# Altium PCB main.PcbDoc (part 3 of 3)
Units mm, origin at the board's own origin, x right, y up, seen from the top; angles counter-clockwise.
Board outline 200 x 85 mm, 2 copper layers (Top Layer, Bottom Layer); 362 components, 202 nets, 1059 pads, 878 vias.
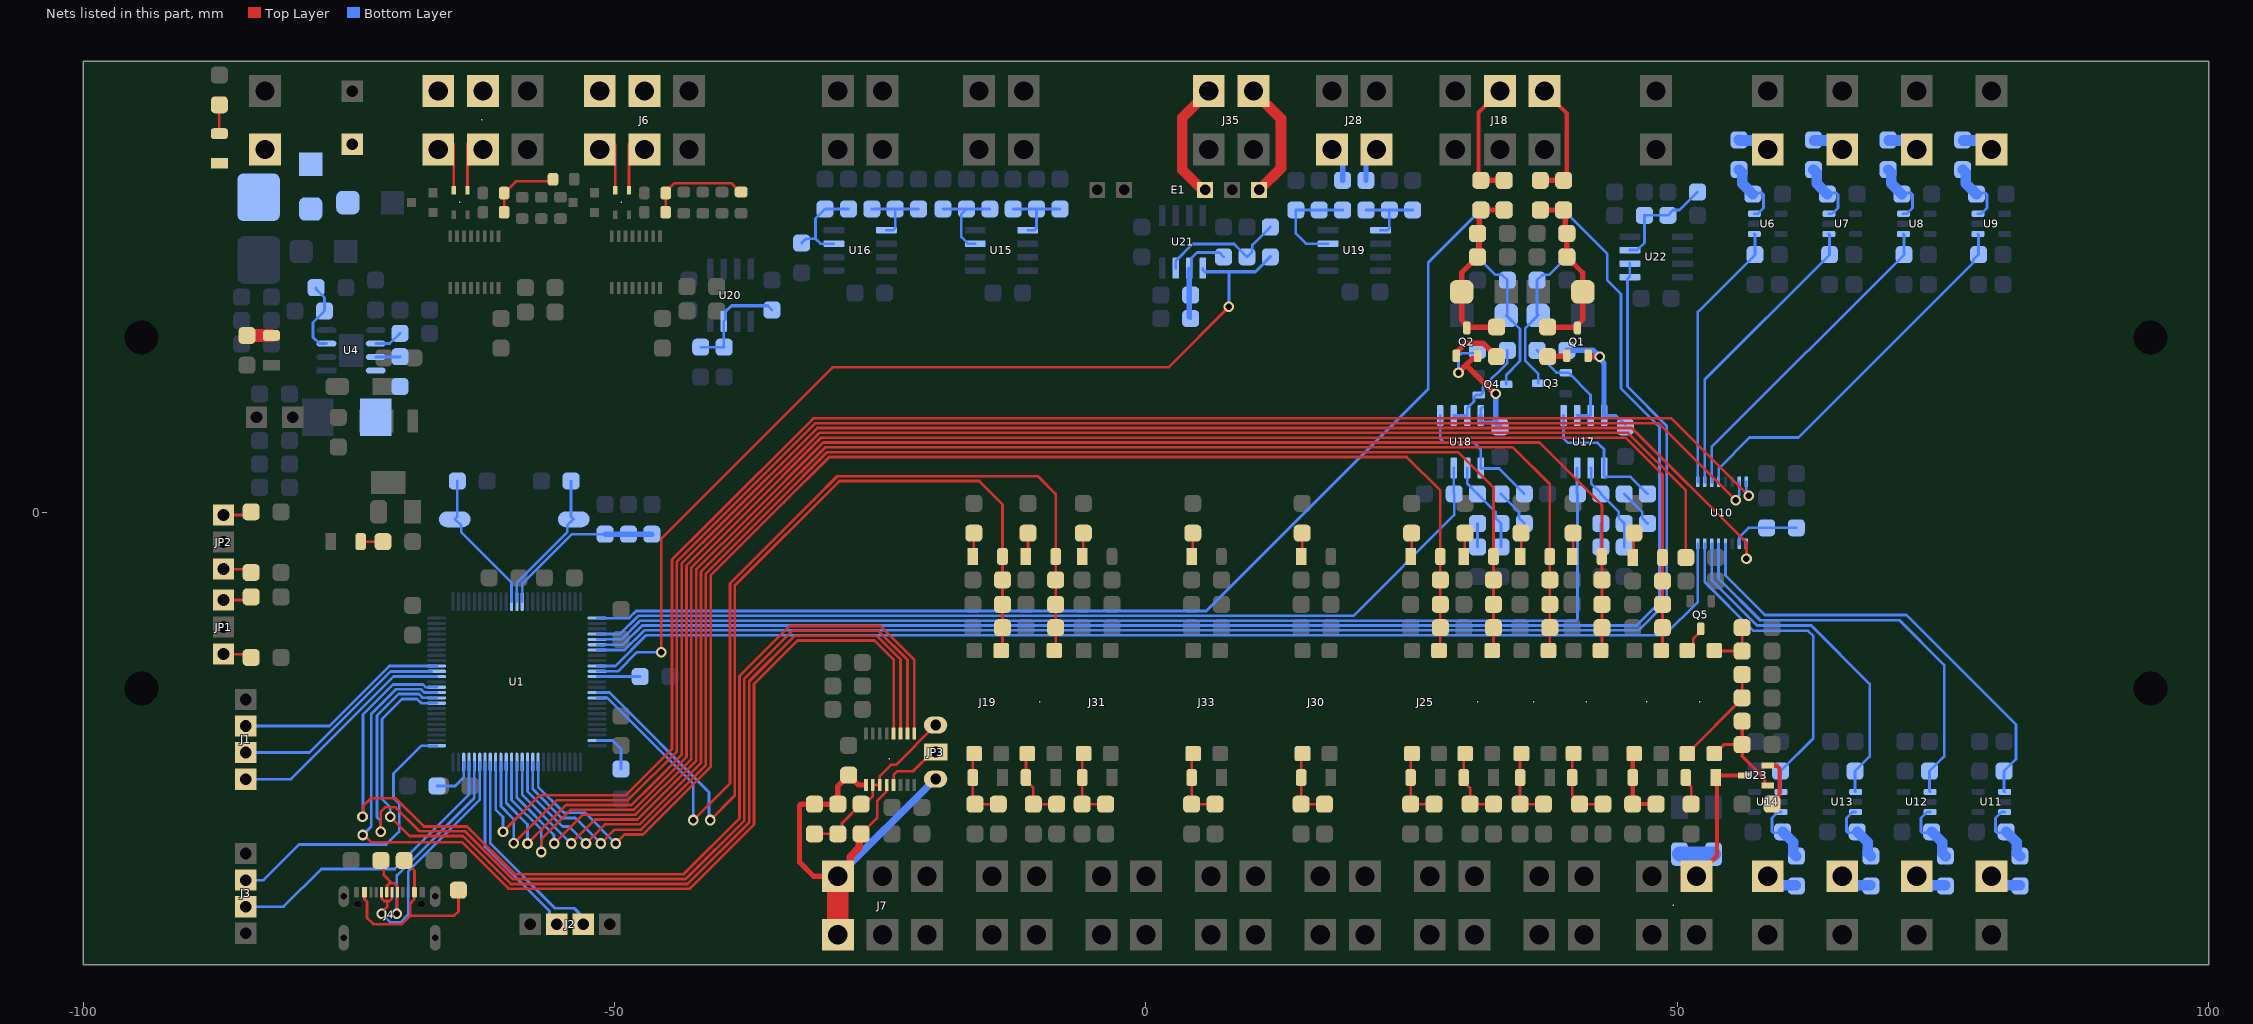
[diagram p3: the nets of this part, all layers, seen from the top]

## Via types
v1: diameter 1, hole 0.6, Top Layer to Bottom Layer, tented both sides, 876 vias
v2: diameter 1, hole 0.6, Top Layer to Bottom Layer, 2 vias

## Nets (pads, with @x,y where several pads share a name; then routed paths per layer and width w, separated by ;. In a path a pad name is that pad's centre, name@x,y a point inside that pad or via, vN(x,y) a via of type N, cw(c..) or ccw(c..) an arc to the next point about the centre after c; other vN are vias at no path point) (continued)
NetC1_2: C1.2 FUSE_SMD1.2 J4.A4B9 J4.B4A9 | length 19.2
  Top Layer w0.254: J4.A4B9@-73.54,-36.081 -73.54,-36.341 -73.3,-36.581 -73.3,-38.1 -72.7,-38.7 -70.026,-38.7 -69.225,-37.899 ; C1.2@-69.8,-32.7 -68.84,-33.66 J4.B4A9@-68.84,-35.68 -68.863,-35.703 -68.863,-36.364 -69.225,-36.726 -69.225,-37.899 ; FUSE_SMD1.2@-64.7,-35.5 -64.7,-37.5 -65.099,-37.899 -69.225,-37.899
NetC2_2: C2.2 U1.13 X1.1 | length 13.7
  Bottom Layer w0.254: U1.13@-59.2,-8.35 -59.2,-6.558 -54.473,-1.831 -54.473,-1.176 -53.897,-0.6 X1.1@-53.85,-0.6 -54.1,-0.35 C2.2@-54.1,3
NetC3_2: C3.2 U1.12 X1.2 | length 13.6
  Bottom Layer w0.254: X1.2@-65.05,-0.6 -64.8,-0.35 C3.2@-64.8,3 ; X1.2@-65.003,-0.6 -64.427,-1.176 -64.427,-1.831 -59.7,-6.558 U1.12@-59.7,-8.35
NetC6_2: C6.2 U1.73 | length 4.3
  Bottom Layer w0.254: C6.2@-66.7,-25.7 -65,-25.7 -64.209,-24.909 -64.209,-23.459 U1.73@-64.2,-23.45
NetC7_2: C7.2 U1.49 | length 4.5
  Bottom Layer w0.254: U1.49@-51.65,-21.4 -51.641,-21.409 -50.191,-21.409 -49.4,-22.2 C7.2@-49.4,-24.1
NetC14_1: ..1@-55.8,31.4 ..1@-60.4,30.1 ..2@-60.4,28.3 | length 7
  Top Layer w0.254: ..2@-60.4,28.3 ..1@-60.4,30.1 -60.4,30.133 -60.036,30.497 -60.003,30.497 -59.3,31.2 -56,31.2 ..1@-55.8,31.4
NetC21_1: ..1@-45.2,30.1 ..2@-45.2,28.3 C21.1 | length 9.7
  Top Layer w0.254: ..2@-45.2,28.3 ..1@-45.2,30.1 -45.2,30.2 -44.373,31.027 -39.027,31.027 -38.2,30.2 C21.1@-38.1,30.2
NetC29_1: C29.1 U4.6 | length 2.7
  Bottom Layer w0.254: U4.6@-72.484,15.935 -71.165,15.935 C29.1@-70.2,16.9
NetC30_1: C30.1 U4.7 | length 2.3
  Bottom Layer w0.254: U4.7@-72.484,14.665 -70.235,14.665 C30.1@-70.2,14.7
NetC30_2: C30.2 L3.1 U4.8
NetC67_1: ..1@-16.9,28.6 ..2@-14.7,28.6 R32.1 U15.3 | length 8.8
  Bottom Layer w0.254: R32.1@-19.1,28.6 ..1@-16.9,28.6 ; U15.3@-16.07,25.335 -16.755,25.335 -17.382,25.962 -17.382,28.118 ..1@-16.9,28.6 ; ..2@-14.7,28.6 ..1@-16.9,28.6
NetC68_1: ..1@-10.3,28.6 ..2@-12.5,28.6 R33.1 U15.5 | length 7.1
  Bottom Layer w0.254: ..2@-12.5,28.6 ..1@-10.3,28.6 ; U15.5@-11.13,26.605 -10.473,26.605 -10.3,26.778 ..1@-10.3,28.6 ; R33.1@-8.1,28.6 ..1@-10.3,28.6
NetC70_1: ..2@-28,28.6 C70.1 R36.1 U16.3 | length 8.8
  Bottom Layer w0.254: C70.1@-32.4,25.4 -32,25.8 -31.1,25.8 ; U16.3@-29.37,25.335 -30.635,25.335 -31.1,25.8 ; ..2@-28,28.6 R36.1@-30.2,28.6 -31.1,27.7 -31.1,25.8
NetC71_1: ..1@-23.6,28.6 ..2@-25.8,28.6 R37.1 U16.5 | length 7.1
  Bottom Layer w0.254: ..2@-25.8,28.6 ..1@-23.6,28.6 ; U16.5@-24.43,26.605 -23.773,26.605 -23.6,26.778 ..1@-23.6,28.6 ; R37.1@-21.4,28.6 ..1@-23.6,28.6
NetC72_1: ..1@37.1,28.5 C72.1 C73.1 D8.2 Q1.3 R42.1 R44.2 | length 17.1
  Top Layer w0.254: R44.2@37.8,17.5 R44.2@37.837,17.462 ; R42.1@39.3,28.5 R42.1@39.45,28.35 ; C73.1@39.45,26.45 C73.1@39.6,26.3 ; Q1.3@40.537,17.462 Q1.3@40.6,17.4 Q1.3@40.6,17.676
  Top Layer w0.5: ..1@37.1,28.5 R42.1@39.3,28.5 ; R44.2@37.837,17.462 Q1.3@40.537,17.462 ; C73.1@39.45,26.45 R42.1@39.45,28.35 ; C73.1@39.6,26.3 C72.1@39.6,24.1 41.1,22.6 D8.2@41.1,20.8 41.1,18.176 Q1.3@40.6,17.676
NetC74_1: ..1@33.7,28.5 C74.1 C75.1 D9.2 Q2.3 R45.2 R47.1 | length 17.1
  Top Layer w0.254: Q2.3@30.2,17.676 Q2.3@30.2,17.4 Q2.3@30.262,17.462 ; C74.1@31.2,24.1 C74.1@31.35,24.25 ; R47.1@31.35,28.35 R47.1@31.5,28.5 ; R45.2@32.962,17.462 R45.2@33,17.5
  Top Layer w0.5: Q2.3@30.2,17.676 29.7,18.176 D9.2@29.7,20.8 29.7,22.6 C74.1@31.2,24.1 ; Q2.3@30.262,17.462 R45.2@32.962,17.462 ; C74.1@31.35,24.25 R47.1@31.35,28.35 ; R47.1@31.5,28.5 ..1@33.7,28.5
NetC76_1: C76.1 D10.2 Q3.3 R48.1 R50.1 | length 16.7
  Bottom Layer w0.254: Q3.3@36.9,12.2 36.9,13.1 35.673,14.327 35.673,17.373 D10.2@36.9,18.6 36.8,18.7 C76.1@36.8,21.9 37.304,22.404 37.904,22.404 R48.1@39.6,24.1 R50.1@39.6,26.3
NetC77_1: C77.1 D11.2 Q4.3 R49.1 R51.1 | length 16.8
  Bottom Layer w0.254: R51.1@31.2,26.3 R49.1@31.2,24.1 32.896,22.404 33.496,22.404 C77.1@34,21.9 34,18.7 D11.2@33.9,18.6 35.2,17.3 35.2,14.3 33.9,13 Q4.3@33.9,12.1
NetC78_1: C78.1 U1.30 U17.3 | length 107.2
  Bottom Layer w0.254: U1.30@-51.65,-11.9 -49.353,-11.9 -47.591,-10.138 40.451,-10.138 40.6,-9.989 C78.1@40.6,1.778 ; C78.1@40.565,1.8 U17.3@40.565,4.23
NetC79_1: C79.1 U1.29 U18.3 | length 89.7
  Bottom Layer w0.254: U1.29@-51.65,-11.4 -49.495,-11.4 -47.779,-9.684 19.516,-9.684 29,-0.2 C79.1@29,1.8 28.96,1.84 U18.3@28.96,4.23
NetC82_1: C82.1 R54.1 R59.1 U17.2 | length 8.7
  Bottom Layer w0.254: U17.2@41.835,4.23 41.884,4.181 41.884,2.788 42.8,1.872 R59.1@42.8,1.8 44.496,0.104 44.496,-0.496 R54.1@45,-1 C82.1@45,-3.2
NetC83_1: C83.1 R56.1 R58.1 U18.2 | length 8.7
  Bottom Layer w0.254: U18.2@30.23,4.23 30.23,2.77 R58.1@31.2,1.8 32.896,0.104 32.896,-0.496 R56.1@33.4,-1 C83.1@33.4,-3.2
NetC91_1: ..1@16.3,28.5 ..2@18.5,28.5 R94.1 U19.3 | length 10
  Bottom Layer w0.254: U19.3@17.13,25.335 15.065,25.335 14.1,26.3 R94.1@14.1,28.5 ..1@16.3,28.5 ..2@18.5,28.5
NetC92_1: ..1@22.9,28.5 ..2@20.7,28.5 C92.1 U19.5 | length 7
  Bottom Layer w0.254: ..2@20.7,28.5 ..1@22.9,28.5 ; U19.5@22.07,26.605 22.727,26.605 22.9,26.778 ..1@22.9,28.5 ; C92.1@25.1,28.5 ..1@22.9,28.5
NetC94_1: C94.1 R96.2 R97.1 U20.3 | length 10.4
  Bottom Layer w0.254: C94.1@-41.9,15.6 R97.1@-39.7,15.6 -39.747,15.646 U20.3@-39.747,18.03 -39.574,18.203 U20.3@-39.574,18.926 ; R96.2@-35.6,19.5 R96.2@-35.2,19.1
  Bottom Layer w0.3: U20.3@-39.574,18.926 -39,19.5 R96.2@-35.6,19.5
NetC99_2: C99.2 R114.1 R116.2 U21.2 | length 9.2
  Bottom Layer w0.251: U21.2@4.07,22.96 4.244,23.134 4.244,23.944 4.8,24.5 6.9,24.5 R114.1@7.3,24.1
  Bottom Layer w0.254: C99.2@4.07,18.43 C99.2@4.2,18.3
  Bottom Layer w0.5: C99.2@4.07,18.43 4.07,20.5 U21.2@4.07,22.96
NetC101_1: C101.1 R117.1 R118.2 U22.3 | length 10.1
  Bottom Layer w0.254: U22.3@45.53,24.735 46.215,24.735 46.9,25.42 R117.1@46.9,28 R118.2@49.1,28 49.604,28.504 50.204,28.504 C101.1@51.9,30.2
NetC102_1: ..1@48.6,-10.8 ..2@48.6,-6.4 ..2@48.6,-8.6 ..3@48.47,-12.95 D34.2 U1.63 | length 157.8
  Top Layer w0.254: v1(-55.7,-31.1) -52.992,-28.392 -48.036,-28.392 -42.784,-23.14 -42.784,-5.152 -37.92,-0.288 -37.92,-0.277 -30.556,7.086 45.114,7.086 48.6,3.6 D34.2@48.6,-4.2 ..2@48.6,-6.4 ..2@48.6,-8.6 ..1@48.6,-10.8 48.6,-12.82 ..3@48.47,-12.95
  Bottom Layer w0.254: U1.63@-59.2,-23.45 -59.2,-26.8 -55.7,-30.3 v1(-55.7,-31.1)
NetD1_2: D1.2 D4.2 FH1.1
NetD2_2: D2.2 R12.2 | length 2.7
  Top Layer w0.254: D2.2@-87.2,35.7 R12.2@-87.2,38.4
NetD3_2: D3.2 R13.2 | length 2.3
  Top Layer w1.2: R13.2@-84.6,16.7 D3.2@-82.3,16.7
NetD6_2: D6.2 R14.2 | length 2.1
  Top Layer w0.254: D6.2@-73.9,-2.7 R14.2@-71.8,-2.7
NetD12_2: ..1@-13.9,-27.4 ..2@-16.3,-24.9 J19.1 R63.1 | length 7.1
  Top Layer w0.254: J19.1@-16.17,-22.65 -16.3,-22.78 ..2@-16.3,-24.9 -16.3,-27.2 R63.1@-16.1,-27.4 ..1@-13.9,-27.4
NetD13_1: D13.1 R66.2 | length 2.2
  Top Layer w0.254: D13.1@-16.3,-4.1 -16.2,-4 R66.2@-16.2,-1.9
NetD14_2: ..1@-8.4,-27.4 ..1@-10.6,-27.4 ..1@-11.17,-22.65 ..2@-11.3,-24.9 | length 7.3
  Top Layer w0.254: ..1@-11.17,-22.65 -11.3,-22.78 ..2@-11.3,-24.9 -11.3,-25.2 -10.6,-25.9 ..1@-10.6,-27.4 ..1@-8.4,-27.4
NetD15_1: D15.1 R71.2 | length 2.3
  Top Layer w0.254: D15.1@-11.3,-4.1 -11.1,-3.9 R71.2@-11.1,-1.9
NetD16_2: ..1@35.2,-27.4 ..1@35.33,-22.65 ..1@37.4,-27.4 ..2@35.2,-24.9 | length 7
  Top Layer w0.254: ..1@35.33,-22.65 35.2,-22.78 ..2@35.2,-24.9 ..1@35.2,-27.4 ..1@37.4,-27.4
NetD17_2: ..1@27.1,-27.4 D17.2 J25.1 R74.1 | length 7
  Top Layer w0.254: J25.1@25.03,-22.65 24.9,-22.78 D17.2@24.9,-24.9 R74.1@24.9,-27.4 ..1@27.1,-27.4
NetD18_1: D18.1 R80.2 | length 2.2
  Top Layer w0.254: D18.1@35.2,-4.1 35.3,-4 R80.2@35.3,-1.9
NetD19_1: D19.1 R81.2 | length 2.2
  Top Layer w0.254: D19.1@24.9,-4.1 25,-4 R81.2@25,-1.9
NetD20_2: ..1@40.8,-27.4 ..1@40.23,-22.65 ..1@43,-27.4 ..2@40.1,-24.9 | length 7.3
  Top Layer w0.254: ..1@40.23,-22.65 40.1,-22.78 ..2@40.1,-24.9 40.1,-26.552 40.8,-27.252 ..1@40.8,-27.4 ..1@43,-27.4
NetD21_2: ..1@30.03,-22.65 ..1@30.5,-27.4 ..1@32.7,-27.4 ..2@29.9,-24.9 | length 7.3
  Top Layer w0.254: ..1@30.03,-22.65 29.9,-22.78 ..2@29.9,-24.9 29.9,-25.267 30.5,-25.867 ..1@30.5,-27.4 ..1@32.7,-27.4
NetD22_1: ..1@40.1,-4.1 R90.2 | length 2.2
  Top Layer w0.254: ..1@40.1,-4.1 40.2,-4 R90.2@40.2,-1.9
NetD23_1: D23.1 R91.2 | length 2.2
  Top Layer w0.254: D23.1@29.9,-4.1 30,-4 R91.2@30,-1.9
NetD24_2: ..1@16.8,-27.4 D24.2 J30.1 R99.1 | length 7
  Top Layer w0.254: J30.1@14.73,-22.65 14.6,-22.78 D24.2@14.6,-24.9 R99.1@14.6,-27.4 ..1@16.8,-27.4
NetD25_1: D25.1 R102.2 | length 2.2
  Top Layer w0.254: D25.1@14.6,-4.1 14.7,-4 R102.2@14.7,-1.9
NetD26_2: ..1@-3.8,-27.4 ..1@-6,-27.4 D26.2 J31.1 | length 7
  Top Layer w0.254: J31.1@-5.87,-22.65 -6,-22.78 D26.2@-6,-24.9 ..1@-6,-27.4 ..1@-3.8,-27.4
NetD27_1: D27.1 R107.2 | length 2.2
  Top Layer w0.254: D27.1@-6,-4.1 -5.9,-4 R107.2@-5.9,-1.9
NetD28_2: ..1@6.5,-27.4 D28.2 J33.1 R109.1 | length 7
  Top Layer w0.254: J33.1@4.43,-22.65 4.3,-22.78 D28.2@4.3,-24.9 R109.1@4.3,-27.4 ..1@6.5,-27.4
NetD29_1: D29.1 R112.2 | length 2.2
  Top Layer w0.254: D29.1@4.3,-4.1 4.4,-4 R112.2@4.4,-1.9
NetD30_1: ..3@51.8,-34.191 D30.1 D31.2 D32.2 U23.3 | length 19.7
  Top Layer w0.254: D30.1@53.727,-25.027 D30.1@53.6,-24.9 D30.1@53.8,-24.7
  Top Layer w0.4: ..3@51.8,-34.191 53.727,-32.264 D30.1@53.727,-25.027 ; D30.1@53.8,-24.7 U23.3@56.308,-24.7
  Bottom Layer w0.254: ..3@51.8,-35 53.13,-33.67 53.13,-32.37 D31.2@53.4,-32.1
  Bottom Layer w1.4: D32.2@50.2,-32.1 D31.2@53.4,-32.1
NetD30_2: D30.2 R129.1 | length 2.7
  Top Layer w0.254: D30.2@50.8,-24.9 50.8,-25.267 51.3,-25.767 R129.1@51.3,-27.4
NetD33_2: ..1@45.8,-27.4 ..1@45.93,-22.65 ..1@48,-27.4 ..2@45.8,-24.9 | length 7
  Top Layer w0.254: ..1@45.8,-22.78 ..1@45.93,-22.65
  Top Layer w0.4: ..1@45.8,-22.78 ..2@45.8,-24.9 ..1@45.8,-27.4 ..1@48,-27.4
NetD34_1: D34.1 R134.2 | length 2.3
  Top Layer w0.254: D34.1@45.8,-4.2 45.9,-4.1 R134.2@45.9,-1.9
NetE1_2: E1.2 J35.1 | length 11.4
  Top Layer w1: E1.2@5.57,30.4 5.32,30.65 5.05,30.65 3.4,32.3 3.4,37.191 J35.1@5.9,39.691
NetE1_4: E1.4 J35.2 | length 11.2
  Top Layer w1: J35.2@10.1,39.691 12.7,37.091 12.7,32.45 E1.4@10.65,30.4
NetF1_1: F1.1 R20.1 U6.3 | length 6.2
  Bottom Layer w0.254: R20.1@57.1,30.1 57.951,30.1 58.1,29.951 58.1,28.7 57.55,28.15 U6.3@57.245,28.15
  Bottom Layer w1: F1.1@55.8,32.3 56.1,32 56.1,31 R20.1@57.1,30
NetF1_2: F1.2 J8.2 | length 2.7
  Bottom Layer w1: F1.2@55.8,35.1 55.85,35.05 58.45,35.05 J8.2@58.5,35
NetF2_1: F2.1 R21.1 U7.3 | length 6.2
  Bottom Layer w0.254: R21.1@64.114,30.1 64.965,30.1 65.114,29.951 65.114,28.7 64.564,28.15 U7.3@64.259,28.15
  Bottom Layer w1: F2.1@62.814,32.3 63.114,32 63.114,31 R21.1@64.114,30
NetF2_2: F2.2 J9.2 | length 2.6
  Bottom Layer w1: F2.2@62.864,35.05 J9.2@65.464,35.05
NetF3_1: F3.1 R22.1 U8.3 | length 6.2
  Bottom Layer w0.254: R22.1@71.129,30.1 71.98,30.1 72.129,29.951 72.129,28.7 71.579,28.15 U8.3@71.274,28.15
  Bottom Layer w1: F3.1@69.829,32.3 70.129,32 70.129,31 R22.1@71.129,30
NetF3_2: F3.2 J10.2 | length 2.6
  Bottom Layer w1: F3.2@69.879,35.05 J10.2@72.479,35.05
NetF4_1: F4.1 R23.1 U9.3 | length 6.2
  Bottom Layer w0.254: R23.1@78.143,30.1 78.994,30.1 79.143,29.951 79.143,28.7 78.593,28.15 U9.3@78.288,28.15
  Bottom Layer w1: F4.1@76.843,32.3 77.143,32 77.143,31 R23.1@78.143,30
NetF4_2: F4.2 J11.2 | length 2.6
  Bottom Layer w1: F4.2@76.893,35.05 J11.2@79.493,35.05
NetF5_1: F5.1 R25.1 U11.3 | length 6.2
  Bottom Layer w0.254: U11.3@80.798,-28.15 80.493,-28.15 79.943,-28.7 79.943,-29.951 80.092,-30.1 R25.1@80.943,-30.1
  Bottom Layer w1: R25.1@80.943,-30 81.943,-31 81.943,-32 F5.1@82.243,-32.3
NetF5_2: F5.2 J12.2 | length 2.6
  Bottom Layer w1: J12.2@79.593,-35.05 F5.2@82.193,-35.05
NetF6_1: F6.1 R26.1 U12.3 | length 6.2
  Bottom Layer w0.254: U12.3@73.784,-28.15 73.479,-28.15 72.929,-28.7 72.929,-29.951 73.077,-30.1 R26.1@73.929,-30.1
  Bottom Layer w1: R26.1@73.929,-30 74.929,-31 74.929,-32 F6.1@75.229,-32.3
NetF6_2: F6.2 J13.2 | length 2.6
  Bottom Layer w1: J13.2@72.579,-35.05 F6.2@75.179,-35.05
NetF7_1: F7.1 R28.1 U13.3 | length 6.2
  Bottom Layer w0.254: U13.3@66.769,-28.15 66.464,-28.15 65.914,-28.7 65.914,-29.951 66.063,-30.1 R28.1@66.914,-30.1
  Bottom Layer w1: R28.1@66.914,-30 67.914,-31 67.914,-32 F7.1@68.214,-32.3
NetF7_2: F7.2 J14.2 | length 2.6
  Bottom Layer w1: J14.2@65.564,-35.05 F7.2@68.164,-35.05
NetF8_1: F8.1 R29.1 U14.3 | length 6.2
  Bottom Layer w0.254: U14.3@59.755,-28.15 59.45,-28.15 58.9,-28.7 58.9,-29.951 59.049,-30.1 R29.1@59.9,-30.1
  Bottom Layer w1: R29.1@59.9,-30 60.9,-31 60.9,-32 F8.1@61.2,-32.3
NetF8_2: F8.2 J15.2 | length 2.6
  Bottom Layer w1: J15.2@58.55,-35.05 F8.2@61.15,-35.05
NetJ1_1: J1.1 U1.89 | length 21.9
  Bottom Layer w0.254: J1.1@-84.7,-25.05 -80.45,-25.05 -70.8,-15.4 U1.89@-66.75,-15.4
NetJ1_2: J1.2 U1.90 | length 20.7
  Bottom Layer w0.254: J1.2@-84.7,-22.55 -78.708,-22.55 -71.081,-14.923 U1.90@-67.2,-14.923
NetJ1_3: J1.3 U1.91 | length 20.3
  Bottom Layer w0.254: J1.3@-84.7,-20.05 -76.85,-20.05 -71.2,-14.4 U1.91@-66.75,-14.4
NetJ2_2: J2.2 U1.68 | length 19.9
  Bottom Layer w0.254: U1.68@-61.7,-23.45 -61.7,-31.1 -55.6,-37.2 -53.8,-37.2 -52.95,-38.05 J2.2@-52.95,-38.7
NetJ2_3: J2.3 U1.69 | length 18
  Bottom Layer w0.254: U1.69@-62.2,-23.45 -62.2,-31.4 -56.132,-37.468 -56.132,-38.018 J2.3@-55.45,-38.7
NetJ4_A6: J4.A6 J4.B6 R5.2 U1.71 | length 24.3
  Top Layer w0.254: R5.2@-72,-32.7 -71.727,-32.973 -71.727,-34.082 -70.956,-34.853 -70.94,-34.853 ; J4.A6@-71.44,-35.68 -71.417,-35.657 -71.417,-35.088 -71.182,-34.853 -70.94,-34.853 ; v1(-70.5,-37.7) -70.463,-37.663 -70.463,-35.703 J4.B6@-70.44,-35.68 -70.463,-35.657 -70.463,-35.088 -70.698,-34.853 -70.94,-34.853
  Bottom Layer w0.254: v1(-70.5,-37.7) -70.5,-34.1 -63.2,-26.8 U1.71@-63.2,-23.45
NetJ4_A7: J4.A7 J4.B7 U1.70 | length 24
  Top Layer w0.254: J4.B7@-71.94,-35.68 -71.917,-35.703 -71.917,-36.272 -71.682,-36.507 -71.44,-36.507 ; v1(-71.9,-37.7) -71.9,-37.6 -71.4,-37.1 -71.4,-36.547 -71.44,-36.507 ; J4.A7@-70.94,-35.68 -70.963,-35.703 -70.963,-36.272 -71.198,-36.507 -71.44,-36.507
  Bottom Layer w0.254: v1(-71.9,-37.7) -71.073,-38.527 -70.157,-38.527 -69.429,-37.798 -69.429,-33.729 -62.7,-27 U1.70@-62.7,-23.45
NetJ5_1: ..1@-66.6,39.691 ..4@-65.15,30.35 ..4@-66.6,34.191 | length 5.8
  Top Layer w0.254: ..4@-66.6,34.691 -65.15,34.691 ..4@-65.15,30.35
NetJ5_2: ..2@-62.4,39.691 ..3@-63.85,30.35 ..5@-62.4,34.191 | length 5.8
  Top Layer w0.254: ..3@-63.85,30.35 -63.85,34.691 ..5@-62.4,34.691
NetJ6_1: ..4@-49.95,30.35 J6.1 J6.4 | length 5.8
  Top Layer w0.254: J6.4@-51.4,34.691 -49.95,34.691 ..4@-49.95,30.35
NetJ6_2: ..3@-48.65,30.35 J6.2 J6.5 | length 5.8
  Top Layer w0.254: ..3@-48.65,30.35 -48.65,34.691 J6.5@-47.2,34.691
NetJ18_2: ..2@33.7,31.3 J18.2 R47.2 | length 11.5
  Top Layer w0.4: R47.2@31.5,31.3 31.299,31.501 31.299,37.69 J18.2@33.3,39.691
  Top Layer w0.5: R47.2@31.5,31.3 ..2@33.7,31.3
NetJ18_3: ..2@37.1,31.3 J18.3 R42.2 | length 11.6
  Top Layer w0.254: R42.2@39.3,31.3 R42.2@39.6,31.6
  Top Layer w0.4: J18.3@37.5,39.691 39.6,37.591 R42.2@39.6,31.6
  Top Layer w0.5: ..2@37.1,31.3 R42.2@39.3,31.3
NetJ28_3: ..1@18.5,31.3 J28.3 | length 4.1
  Bottom Layer w0.254: J28.3@17.5,35 17.5,34.34 J28.3@18.5,33.34
  Bottom Layer w0.5: ..1@18.5,31.3 J28.3@18.5,33.34
NetJ28_4: ..1@20.7,31.3 J28.4 | length 4.1
  Bottom Layer w0.254: J28.4@20.7,33.34 21.7,34.34 J28.4@21.7,35
  Bottom Layer w0.5: ..1@20.7,31.3 J28.4@20.7,33.34
NetJ37_1: ..1@53.47,-12.95 R123.1 R124.1 | length 4.9
  Top Layer w0.254: ..1@53.47,-12.95 53.52,-13 R124.1@56.1,-13 R123.1@56.1,-10.8
NetJ37_2: ..2@50.93,-12.95 Q5.3 | length 2.6
  Top Layer w0.254: ..2@50.93,-12.95 51.486,-12.394 51.486,-11.864 52.2,-11.15 Q5.3@52.2,-10.9
NetJ37_3: ..3@50.93,-22.65 R125.1 R126.1 | length 9.6
  Top Layer w0.254: ..3@50.93,-22.65 50.933,-22.65 56.1,-17.483 R126.1@56.1,-17.4 R125.1@56.1,-15.2
NetJ37_4: ..4@53.47,-22.65 R121.2 R122.2 U23.1 | length 10.1
  Top Layer w0.254: ..4@53.47,-22.65 ..4@53.527,-22.65 ; U23.1@58.228,-25.487 58.381,-25.64 U23.1@58.492,-25.64
  Top Layer w0.3: ..4@53.527,-22.65 54.377,-21.8 R121.2@56.1,-21.8 ; R122.2@56.1,-19.6 R121.2@56.1,-21.8 ; U23.1@58.228,-25.487 58.228,-25.028 56.1,-22.9 R121.2@56.1,-21.8
NetJP1_1: JP1.1 R2.1 | length 2.7
  Top Layer w0.254: JP1.1@-86.8,-13.28 -86.777,-13.303 -84.497,-13.303 R2.1@-84.2,-13.6
NetJP1_3: JP1.3 R3.1 | length 2.7
  Top Layer w0.254: JP1.3@-86.8,-8.2 -86.787,-8.186 -84.487,-8.186 R3.1@-84.2,-7.9
NetJP2_1: JP2.1 R6.1 | length 2.7
  Top Layer w0.254: JP2.1@-86.8,-5.28 -86.777,-5.303 -84.497,-5.303 R6.1@-84.2,-5.6
NetJP2_3: JP2.3 R7.1 | length 2.7
  Top Layer w0.254: JP2.3@-86.8,-0.2 -86.787,-0.186 -84.487,-0.186 R7.1@-84.2,0.1
NetQ1_1: Q1.1 R44.1 | length 1.8
  Top Layer w0.254: R44.1@37.8,14.7 R44.1@37.837,14.738 ; Q1.1@39.537,14.738 Q1.1@39.6,14.8
  Top Layer w0.5: R44.1@37.837,14.738 Q1.1@39.537,14.738
NetQ2_1: Q2.1 R45.1 | length 5
  Top Layer w0.254: Q2.1@29.2,14.8 Q2.1@29.2,14.824
  Top Layer w0.5: Q2.1@29.2,14.824 29.3,14.924 29.3,15.2 30.08,15.98 31.72,15.98 R45.1@33,14.7
NetR1_1: R1.1 U1.37 | length 4.1
  Bottom Layer w0.254: U1.37@-51.65,-15.4 R1.1@-47.6,-15.4
NetR16_2: ..1@-78.1,21.2 R16.2 U4.3 | length 7
  Bottom Layer w0.254: ..1@-78.1,21.2 -78.1,21.052 -77.3,20.252 R16.2@-77.3,19 -78.38,17.92 -78.38,16.533 -77.782,15.935 U4.3@-77.116,15.935
NetR24_2: R24.2 R27.1 U10.2 | length 6.4
  Bottom Layer w0.254: U10.2@55.825,-2.918 55.843,-2.9 55.843,-2.257 56.7,-1.4 R24.2@61.2,-1.4
NetR38_2: ..2@33.7,28.5 R40.1 U1.26 | length 108.2
  Bottom Layer w0.254: U1.26@-51.65,-9.9 -48.637,-9.9 -47.967,-9.23 5.67,-9.23 26.561,11.661 26.561,23.561 R40.1@31.5,28.5 ..2@33.7,28.5
NetR39_2: ..2@37.1,28.5 R41.1 U1.31 | length 144.5
  Bottom Layer w0.254: U1.31@-51.65,-12.4 -49.211,-12.4 -47.403,-10.592 46.166,-10.592 48.327,-8.431 48.327,8.073 44.7,11.7 44.7,20.6 43.4,21.9 43.4,24.4 R41.1@39.3,28.5 ..2@37.1,28.5
NetR54_2: R54.2 R55.1 | length 3.7
  Bottom Layer w0.254: R54.2@45,1.8 46.696,0.104 46.696,-0.496 R55.1@47.2,-1
NetR56_2: R56.2 R57.1 | length 3.7
  Bottom Layer w0.254: R56.2@33.4,1.8 35.096,0.104 35.096,-0.496 R57.1@35.6,-1
NetR58_2: R58.2 R60.1 | length 2.2
  Bottom Layer w0.254: R60.1@31.2,-3.2 R58.2@31.2,-1
NetR59_2: R59.2 R61.1 | length 2.2
  Bottom Layer w0.254: R61.1@42.8,-3.2 R59.2@42.8,-1
NetR113_1: R113.1 R115.1 U21.3 | length 12.2
  Bottom Layer w0.254: U21.3@2.8,23.03 2.8,23.715 4.385,25.3 8.3,25.3 R115.1@9.5,24.1 10.004,24.604 10.004,25.204 R113.1@11.7,26.9
NetR113_2: R113.2 U1.36 U21.1 | length 90.4
  Top Layer w0.254: v1(-45.6,-13.1) -45.6,-2.4 -29.5,13.7 2.1,13.7 v1(7.8,19.4)
  Bottom Layer w0.254: U1.36@-51.65,-14.9 -49.7,-14.9 -47.9,-13.1 v1(-45.6,-13.1) ; U21.1@5.34,23.03 5.34,22.873 U21.1@5.513,22.7 ; 7.8,22.594 7.906,22.7
  Bottom Layer w0.3: U21.1@5.513,22.7 7.906,22.7 10.3,22.7 R113.2@11.7,24.1 ; v1(7.8,19.4) 7.8,22.594
NetR120_2: R120.2 U23.2 | length 5.2
  Top Layer w0.254: R120.2@58.482,-27.818 R120.2@58.9,-27.4 ; R120.2@59.132,-27.268 R120.2@59.132,-27.021
  Top Layer w0.4: U23.2@58.492,-23.76 58.531,-23.799 59.366,-23.799 59.6,-24.033 59.6,-26.552 R120.2@59.132,-27.021
NetR127_1: R127.1 U1.64 | length 153.4
  Top Layer w0.254: v1(-56.9,-31.9) -56.9,-30.7 -54.138,-27.938 -48.274,-27.938 -48.224,-27.938 -43.238,-22.952 -43.238,-4.964 -38.374,-0.1 -38.374,-0.089 -30.744,7.54 45.36,7.54 50.8,2.1 R127.1@50.8,-4.2
  Bottom Layer w0.254: U1.64@-59.7,-23.45 -59.7,-27 -56.9,-29.8 v1(-56.9,-31.9)
NetRS1_1: ..1@-21.8,-20.75 U1.87 | length 99.8
  Top Layer w0.254: v1(-73.727,-28.576) -73.668,-28.517 -73.668,-27.568 -72.946,-26.846 -70.612,-26.846 -67.958,-29.5 -63.9,-29.5 -59.4,-34 -43.5,-34 -38.244,-28.744 -38.244,-15.344 -33.538,-10.638 -24.986,-10.638 -21.8,-13.824 ..1@-21.8,-20.75
  Bottom Layer w0.254: v1(-73.727,-28.576) -73.677,-28.526 -73.677,-18.977 -70.838,-16.138 -68.036,-16.138 -67.783,-16.391 -66.759,-16.391 U1.87@-66.75,-16.4
NetRS1_2: ..2@-22.45,-20.75 U1.85 | length 97.6
  Top Layer w0.254: v1(-72,-30) -72,-28.1 -71.6,-27.7 -70.6,-27.7 -68.346,-29.954 -64.088,-29.954 -59.761,-34.281 -59.588,-34.454 -43.312,-34.454 -43.139,-34.281 -37.79,-28.932 -37.79,-15.59 -33.292,-11.092 -25.174,-11.092 -22.45,-13.816 ..2@-22.45,-20.75
  Bottom Layer w0.254: v1(-72,-30) -72,-29 -72.354,-28.646 -72.354,-19.054 -70.346,-17.046 -68.412,-17.046 -68.058,-17.4 U1.85@-66.75,-17.4
NetRS1_3: ..3@-23.1,-20.75 U1.84 | length 91.6
  Top Layer w0.254: v1(-71.1,-28.6) -69.292,-30.408 -64.276,-30.408 -59.949,-34.735 -59.776,-34.908 -43.124,-34.908 -42.951,-34.735 -37.336,-29.12 -37.336,-15.836 -33.046,-11.546 -25.362,-11.546 -23.1,-13.808 ..3@-23.1,-20.75
  Bottom Layer w0.254: v1(-71.1,-28.6) -71.119,-28.581 -71.119,-27.681 -71.9,-26.9 -71.9,-19.4 -70,-17.5 -68.6,-17.5 -68.2,-17.9 U1.84@-66.75,-17.9
NetRS1_4: ..4@-23.75,-20.75 U1.86 | length 96.1
  Top Layer w0.254: v1(-73.7,-30.3) -73.578,-30.3 -72.878,-31 -64.326,-31 -60.137,-35.189 -59.964,-35.362 -42.936,-35.362 -42.763,-35.189 -36.882,-29.308 -36.882,-16.082 -32.8,-12 -25.55,-12 -23.75,-13.8 ..4@-23.75,-20.75
  Bottom Layer w0.254: v1(-73.7,-30.3) -72.9,-29.5 -72.9,-18.9 -70.592,-16.592 -68.224,-16.592 -67.916,-16.9 U1.86@-66.75,-16.9
NetU1_32: U1.32 U22.1 U22.2 | length 136
  Bottom Layer w0.254: U1.32@-51.65,-12.9 -49.069,-12.9 -47.215,-11.046 46.354,-11.046 49,-8.4 49,8.2 45.3,11.9 45.3,22.022 45.473,22.195 U22.1@45.53,22.195 U22.2@45.53,23.465
NetU1_35: U1.35 U10.8 | length 111.5
  Bottom Layer w0.254: U1.35@-51.65,-14.4 -49.927,-14.4 -47.027,-11.5 48.8,-11.5 51.925,-8.375 U10.8@51.925,-2.918
NetU1_65: U1.65 U10.1 | length 157.3
  Top Layer w0.251: -39.874,-0.952 -39.874,-0.95 -30.932,7.992 45.708,7.992 56.5,-2.8 v1(56.5,-4.3)
  Top Layer w0.254: v1(-58.2,-31.1) -54.584,-27.484 -48.412,-27.484 -46.457,-25.529 -43.692,-22.764 -43.692,-4.776 -39.874,-0.958 -39.874,-0.952
  Bottom Layer w0.251: U10.1@56.475,-2.918 56.487,-2.93 56.487,-4.287 v1(56.5,-4.3)
  Bottom Layer w0.254: U1.65@-60.2,-23.45 -60.2,-27.3 -58.2,-29.3 v1(-58.2,-31.1)
NetU1_66: U1.66 U10.15 | length 154.9
  Top Layer w0.251: -40.514,-0.954 -40.514,-0.952 -31.119,8.443 48.233,8.443 v1(55.5,1.177)
  Top Layer w0.254: v1(-59.5,-31.099) -55.43,-27.03 -48.73,-27.03 -44.146,-22.446 -44.146,-4.588 -40.514,-0.956 -40.514,-0.954
  Bottom Layer w0.251: v1(55.5,1.177) 55.5,1.379 55.825,1.704 U10.15@55.825,2.918
  Bottom Layer w0.254: U1.66@-60.7,-23.45 -60.7,-27.6 -59.5,-28.8 v1@-59.5,-31.077
NetU1_67: U1.67 U10.16 | length 155
  Top Layer w0.251: -41.237,-1.037 -31.306,8.894 49.441,8.894 v1(56.726,1.609)
  Top Layer w0.254: v1(-60.5,-30) -57.076,-26.576 -48.976,-26.576 -44.6,-22.2 -44.6,-4.4 -41.237,-1.037
  Bottom Layer w0.251: U10.16@56.475,2.918 56.475,2.028 56.726,1.777 v1(56.726,1.609)
  Bottom Layer w0.254: U1.67@-61.2,-23.45 -61.2,-27.9 -60.5,-28.6 v1(-60.5,-30)
out1: R55.2 U17.1 U17.5 | length 13.7
  Bottom Layer w0.254: U17.5@39.295,9.17 39.295,7.005 39.7,6.6 42.5,6.6 43.105,5.995 43.105,3.545 43.25,3.4 45.6,3.4 R55.2@47.2,1.8
out2: Q3.1 R52.1 U17.6 U17.7 | length 10.1
  Bottom Layer w0.254: R52.1@36.8,15.3 37.304,14.796 37.304,14.532 38.636,13.2 Q3.1@39.5,13.2 39.75,13.2 41.835,11.115 U17.7@41.835,9.17 U17.6@40.565,9.17
out3: R57.2 U18.1 U18.5 | length 13.3
  Bottom Layer w0.254: U18.5@27.69,9.17 27.69,7.005 28.095,6.6 30.895,6.6 31.5,5.995 U18.1@31.5,4.23 31.557,4.173 33.227,4.173 R57.2@35.6,1.8
out4: Q4.1 R53.1 U18.6 U18.7 | length 9.2
  Bottom Layer w0.254: U18.6@28.96,9.17 U18.7@30.23,9.17 30.23,9.855 30.857,10.482 30.857,10.881 31.076,11.1 Q4.1@31.3,11.1 31.498,11.1 31.717,11.319 31.717,11.831 34,14.114 R53.1@34,15.3
Pin: C28.1 D1.1 D2.1 POWER1.2
Pressure-input1: C51.1 U6.1 U10.9 | length 25.6
  Bottom Layer w0.254: U10.9@51.925,2.918 51.925,18.925 C51.1@57.292,24.292 ; U6.1@57.245,26.25 57.3,26.195 C51.1@57.3,24.3
Pressure-input2: C56.1 U8.1 U10.11 | length 30.8
  Bottom Layer w0.254: U10.11@53.225,2.918 53.225,6.196 C56.1@71.32,24.292 ; U8.1@71.274,26.25 71.329,26.195 C56.1@71.329,24.3
Pressure-input3: C60.1 U10.4 U11.1 | length 43
  Bottom Layer w0.254: U10.4@54.525,-2.918 54.525,-5.894 58.231,-9.6 71.57,-9.6 81.87,-19.9 81.87,-23.173 C60.1@80.751,-24.292 ; C60.1@80.743,-24.3 80.743,-26.195 U11.1@80.798,-26.25
Pressure-input4: C64.1 U10.6 U13.1 | length 33.1
  Bottom Layer w0.254: U10.6@53.225,-2.918 53.225,-6.325 57.5,-10.6 62.6,-10.6 68.1,-16.1 68.1,-22.914 C64.1@66.723,-24.292 ; C64.1@66.714,-24.3 66.714,-26.195 U13.1@66.769,-26.25
Pressure-input5: C52.1 U7.1 U10.10 | length 28.2
  Bottom Layer w0.254: U10.10@52.575,2.918 52.575,12.561 C52.1@64.306,24.292 ; U7.1@64.259,26.25 64.314,26.195 C52.1@64.314,24.3
Pressure-input6: C57.1 U9.1 U10.12 | length 36.2
  Bottom Layer w0.254: U10.12@53.875,2.918 53.9,2.943 53.9,4.2 56.8,7.1 61.4,7.1 77.838,23.538 77.838,23.796 C57.1@78.343,24.3 78.343,26.195 U9.1@78.288,26.25
Pressure-input7: C61.1 U10.5 U12.1 | length 40.4
  Bottom Layer w0.254: U10.5@53.875,-2.918 53.875,-6.175 57.8,-10.1 70.9,-10.1 75.1,-14.3 75.1,-22.929 C61.1@73.737,-24.292 ; C61.1@73.729,-24.3 73.729,-26.195 U12.1@73.784,-26.25
Pressure-input8: C65.1 U10.7 U14.1 | length 31.9
  Bottom Layer w0.254: U10.7@52.575,-2.918 52.575,-6.501 57.174,-11.1 62.3,-11.1 62.8,-11.6 62.8,-21.2 C65.1@59.708,-24.292 ; C65.1@59.7,-24.3 59.7,-26.195 U14.1@59.755,-26.25
RESET: C4.2 C5.2 R4.1 U1.14 | length 15.8
  Bottom Layer w0.254: U1.14@-58.7,-8.35 -58.7,-6.7 -54,-2 C4.2@-50.9,-2
  Bottom Layer w0.5: C4.2@-50.9,-2 C5.2@-48.7,-2 R4.1@-46.5,-2
RGND: ..2@-26.8,-30.2 ..2@-29,-27.4 ..9 ..12 C43.2 CY1.1 J7.3 J7.6 JP3.3 | length 48.6
  Top Layer w0.254: J7.6@-29,-35 J7.6@-29,-34.191 ; J7.6@-29,-33.5 J7.6@-29,-32.9 ; ..2@-26.8,-30.2 -25.3,-28.7 -25.3,-27.1 -24.448,-26.248 -24.448,-25.648 ..12@-24.4,-25.6 ; ..9@-26.35,-25.6 ..9@-26.302,-25.552
  Top Layer w0.5: C43.2@-31.2,-27.4 -32.451,-27.4 -32.6,-27.549 -32.6,-32.863 -31.272,-34.191 J7.6@-29,-34.191 ; C43.2@-30.7,-27.4 ..2@-29,-27.4 -29,-25.7 CY1.1@-27.975,-24.675 -27.05,-25.6 ..9@-26.421,-25.6
  Top Layer w0.7: J7.6@-29,-34.191 -29,-33.5 -28.309,-33.5 -27.85,-33.041 -27.85,-32.35 -26.975,-31.475 -26.975,-30.375 ..2@-26.8,-30.2
  Top Layer w2: J7.3@-29,-39.691 J7.6@-29,-35
  Bottom Layer w0.254: J7.6@-29,-35 J7.6@-29,-34.191 ; JP3.3@-19.849,-25.04 JP3.3@-19.8,-25.04
  Bottom Layer w0.7: J7.6@-29,-34.191 JP3.3@-19.849,-25.04
rpm_A: ..1@38,-10.8 ..2@38,-6.3 ..2@38,-8.6 ..3@37.87,-12.95 D18.2 U1.61 | length 144.1
  Top Layer w0.254: v1(-52.7,-31.1) -50.9,-29.3 -47.659,-29.3 -41.876,-23.517 -41.876,-5.528 -34.998,1.35 -34.998,1.361 -30.18,6.178 34.522,6.178 38,2.7 D18.2@38,-4.1 ..2@38,-6.3 ..2@38,-8.6 ..1@38,-10.8 38,-12.82 ..3@37.87,-12.95
  Bottom Layer w0.254: U1.61@-58.2,-23.45 -58.2,-26.2 -54.9,-29.5 -54.3,-29.5 v1(-52.7,-31.1)
rpm_B: ..1@42.9,-10.8 ..2@42.9,-4.1 ..2@42.9,-6.3 ..2@42.9,-8.6 ..3@42.77,-12.95 U1.62 | length 148.9
  Top Layer w0.254: v1(-54.1,-31.1) -51.846,-28.846 -47.847,-28.846 -42.33,-23.329 -42.33,-5.34 -37.466,-0.476 -37.466,-0.465 -30.368,6.632 37.015,6.632 42.9,0.747 ..2@42.9,-4.1 ..2@42.9,-6.3 ..2@42.9,-8.6 ..1@42.9,-10.8 42.9,-12.82 ..3@42.77,-12.95
  Bottom Layer w0.254: U1.62@-58.7,-23.45 -58.7,-26.5 v1(-54.1,-31.1)
SEL: ..13 JP3.2 | length 5.8
  Top Layer w0.254: ..13@-23.75,-25.6 -23.75,-24.65 -23.4,-24.3 -21.9,-24.3 -20.1,-22.5 JP3.2@-19.8,-22.5
speed_A: C87.1 D19.2 J25.3 R78.2 R79.2 U1.59 | length 131.5
  Top Layer w0.254: v1(-49.9,-31.1) -49.054,-30.254 -47.329,-30.254 -40.968,-23.893 -40.968,-5.904 -34.09,0.974 -34.09,0.985 -29.804,5.27 24.53,5.27 27.7,2.1 D19.2@27.7,-4.1 R78.2@27.7,-6.3 R79.2@27.7,-8.6 C87.1@27.7,-10.8 27.7,-12.82 J25.3@27.57,-12.95
  Bottom Layer w0.254: U1.59@-57.2,-23.45 -57.2,-25.79 -54.79,-28.2 -52.8,-28.2 v1(-49.9,-31.1)
speed_B: ..1@32.7,-10.8 ..2@32.7,-6.3 ..2@32.7,-8.6 ..3@32.57,-12.95 D23.2 U1.60 | length 137.6
  Top Layer w0.254: v1(-51.3,-31.1) -50,-29.8 -47.517,-29.8 -41.422,-23.705 -41.422,-5.716 -34.544,1.162 -34.544,1.173 -29.992,5.724 29.376,5.724 32.7,2.4 D23.2@32.7,-4.1 ..2@32.7,-6.3 ..2@32.7,-8.6 ..1@32.7,-10.8 32.7,-12.82 ..3@32.57,-12.95
  Bottom Layer w0.254: U1.60@-57.7,-23.45 -57.7,-26 -55,-28.7 -53.7,-28.7 v1(-51.3,-31.1)
SWD_CLK: J3.3 U1.76 | length 27.1
  Bottom Layer w0.254: J3.3@-84.7,-34.55 -83.05,-34.55 -79.7,-31.2 -71.5,-31.2 -70.273,-29.973 -70.273,-27.342 -70.8,-26.815 -70.8,-24.53 -68.17,-21.9 U1.76@-66.75,-21.9
SWD_IO: J3.2 U1.72 | length 28.4
  Bottom Layer w0.254: J3.2@-84.7,-37.05 -81.15,-37.05 -77.6,-33.5 -70.7,-33.5 -63.7,-26.5 U1.72@-63.7,-23.45
switch-on: C84.1 D13.2 J19.3 R64.2 R65.2 U1.40 | length 84.1
  Top Layer w0.254: v1(-41,-28.9) -38.698,-26.598 -38.698,-6.845 -28.853,3 -15.7,3 -13.5,0.8 D13.2@-13.5,-4.1 R65.2@-13.5,-6.3 R64.2@-13.5,-8.6 C84.1@-13.5,-10.8 -13.5,-12.82 J19.3@-13.63,-12.95
  Bottom Layer w0.254: U1.40@-51.65,-16.9 -50.5,-16.9 -41.119,-26.281 -41.119,-28.781 v1(-41,-28.9)
switch-start: ..1@-8.5,-10.8 ..2@-8.5,-6.3 ..2@-8.5,-8.6 ..3@-8.63,-12.95 D15.2 U1.41 | length 89.8
  Top Layer w0.254: v1(-42.6,-28.9) -39.152,-25.452 -39.152,-6.657 -31.231,1.265 -31.231,1.275 -29.052,3.454 -10.154,3.454 -8.5,1.8 D15.2@-8.5,-4.1 ..2@-8.5,-6.3 ..2@-8.5,-8.6 ..1@-8.5,-10.8 -8.5,-12.82 ..3@-8.63,-12.95
  Bottom Layer w0.254: U1.41@-51.65,-17.4 -51.641,-17.409 -50.691,-17.409 -42.6,-25.5 v1(-42.6,-28.9)
vcc1: C80.1 Q1.2 R52.2 U17.8 | length 12.5
  Top Layer w0.254: Q1.2@41.6,14.8 Q1.2@41.7,14.7
  Top Layer w0.5: Q1.2@41.7,14.7 v1(42.7,14.7)
  Bottom Layer w0.254: v1@42.7,14.498 v1(42.7,14.7) ; U17.8@43.105,9.17 44.23,9.17 C80.1@45.1,8.3
  Bottom Layer w0.5: R52.2@39.6,15.3 42.1,15.3 v1(42.7,14.7) ; v1@42.7,14.498 43.105,14.093 U17.8@43.105,9.17
vcc2: C81.1 Q2.2 R53.2 U18.8 | length 15.8
  Top Layer w0.254: Q2.2@31.02,14.5 Q2.2@31.09,14.571
  Top Layer w0.5: v1(29.4,13.2) 30.125,13.925 ; Q2.2@31.02,14.5 30.7,14.5 30.125,13.925 ; v1@32.85,11.2 30.125,13.925
  Bottom Layer w0.254: v1(29.4,13.2) 29.4,14.752 29.675,15.027 30.927,15.027 R53.2@31.2,15.3 ; U18.8@31.5,9.17 31.5,9.78 U18.8@31.673,9.953
  Bottom Layer w0.4: U18.8@31.5,9.17 31.5,8.6 31.6,8.5 C81.1@32.9,8.5
  Bottom Layer w0.5: v1(32.9,11.2) 32.9,8.5 C81.1@33.3,8.1
VISOOUT: ..1@-26.8,-27.4 ..1@-29,-30.2 ..10 ..11 C43.1 JP3.1 | length 16
  Top Layer w0.254: C43.1@-30.7,-30.2 ..1@-29,-30.2 -28.602,-29.802 -28.602,-29.202 ..1@-26.8,-27.4 ; ..1@-26.3,-27.252 -25.7,-26.652 ..10@-25.7,-25.6 ..11@-25.05,-25.6 -25.05,-24.75 -24,-23.7 -23.54,-23.7 JP3.1@-19.8,-19.96
pads on no net: ..16 B1.2 B1.3 B1.13 B1.16 B2.2 B2.3 B2.13 B2.16 J4. J4.A5 J4.A8 J4.B5 J4.B8 J4.SH1 J4.SH2 J4.SH3 J4.SH4 J29.3 J32.3 J34.3 U1.1 U1.2 U1.3 U1.4 U1.5 U1.6 U1.7 U1.8 U1.9 U1.33 U1.34 U1.38 U1.39 U1.42 U1.43 U1.44 U1.45 U1.46 U1.47 U1.48 U1.53 U1.54 U1.55 U1.77 U1.78 U1.79 U1.80 U1.83 U1.88 U1.92 U1.95 U1.96 U1.97 U1.98 U4.4 U20.5 U20.6 U20.7 U21.5 U21.6 U21.7 U22.5 U22.6 U22.7

## Polygon pours and split planes (outlines as drawn)
MCUGND on Top Layer "MCUGND_L01_P260" (solid, remove dead copper, pour order 260): -35.2,42.5 -35.2,-42.5 89,-42.5 89,42.5
MCUGND on Top Layer "MCUGND_L01_P258" (solid, remove dead copper, pour order 258): -90.6,42.5 -70.3,42.5 -70.3,22.2 -35,22.2 -35,-42.5 -90.6,-42.5
3v3MCU on Top Layer "3V3MCU_L01_P262" (solid, pour order 262): 60.2,-15.3 60.2,-12.7 61.4,-12.7 61.4,-15.3
24vMCU on Top Layer "NONET_L01_P-001" (solid, remove dead copper, pour order 255): -81.6,26.6 -81.6,21.5 -69.2,21.5 -67.7,23 -67.7,24.3 -78.3,24.3 -80.6,26.6
NetJ5_1 on Top Layer "NETJ5_1_L01_P250" (solid, remove dead copper, pour order 250): -68.022,42.321 -68.022,31.921 -65.022,31.921 -65.022,42.321
NetJ5_2 on Top Layer "NETJ5_2_L01_P249" (solid, remove dead copper, pour order 249): -63.822,42.321 -63.822,31.921 -60.822,31.921 -60.822,42.321
MGND on Top Layer "MGND_L01_P248" (solid, remove dead copper, pour order 248): -59.622,42.321 -59.622,31.921 -53.522,31.921 -53.522,42.321
MGND on Top Layer "MGND_L01_P247" (solid, remove dead copper, pour order 247): -44.422,42.321 -44.422,31.921 -37.1,31.921 -37.1,42.321
3v3MCU on Top Layer "3V3MCU_L01_P246" (solid, remove dead copper, pour order 246): -72.622,15.321 -70.522,15.321 -70.522,6.921 -69.622,6.921 -69.622,1.621 -71.422,1.621 -71.422,-1.479 -72.922,-1.479 -72.922,1.621 -74.722,1.621 -74.722,6.921 -72.622,6.921
5vMCU on Top Layer "5VMCU_L01_P245" (solid, remove dead copper, pour order 245): -80.222,12.521 -80.222,8.221 -73.022,8.221 -73.022,12.521
Pin on Top Layer "PIN_L01_P244" (solid, remove dead copper, pour order 244): -88.222,33.021 -86.022,33.021 -86.022,36.921 -73.622,36.921 -73.622,32.221 -88.222,32.221
MCUGND on Top Layer "MCUGND_L01_P243" (solid, remove dead copper, pour order 243): -88.022,42.321 -70.222,42.321 -70.222,37.121 -86.122,37.121 -86.122,40.421 -88.022,40.421
NetJ6_1 on Top Layer "NETJ6_1_L01_P242" (solid, remove dead copper, pour order 242): -52.822,42.321 -52.822,31.921 -49.822,31.921 -49.822,42.321
NetJ6_2 on Top Layer "NETJ6_2_L01_P241" (solid, remove dead copper, pour order 241): -48.622,42.321 -48.622,31.921 -45.622,31.921 -45.622,42.321
MCUGND on Bottom Layer "MCUGND_L02_P259" (solid, remove dead copper, pour order 259): -38.5,42.5 -38.5,-42.5 89,-42.5 89,42.5
MCUGND on Bottom Layer "MCUGND_L02_P257" (solid, remove dead copper, pour order 257): -90.6,42.5 -69.6,42.5 -69.6,31 -37.2,31 -37.2,-42.5 -90.6,-42.5
24vMCU on Bottom Layer "24VMCU_L02_P251" (solid, remove dead copper, pour order 251): -34,40.1 86.1,40.1 86.1,-40 -11.8,-40 -11.8,-36.1 83.5,-36.1 83.5,36.1 -31.7,36.1 -31.7,30.5 -34,28.2
MCUGND on Bottom Layer "MCUGND_L02_P253" (solid, remove dead copper, pour order 253): -72.9,42.6 -69.6,42.6 -69.6,21.3 -73.5,21.3 -73.5,12.2 -84.8,12.2 -84.8,13.9 -75.876,13.9 -75.876,26.5 -72.9,26.5
24vMCU on Bottom Layer "NONET_L01_P-001" (solid, remove dead copper, pour order 252): -33.2,29 -35.7,26.5 -63.3,26.5 -68.6,21.2 -70.7,21.2 -70.7,24.2 -65.7,29.2 -35.8,29.2 -33.2,31.8
NetJ5_1 on Bottom Layer "NETJ5_1_L02_P240" (solid, remove dead copper, pour order 240): -68.1,42.5 -68.1,32.1 -65.1,32.1 -65.1,42.5
NetJ5_2 on Bottom Layer "NETJ5_2_L02_P239" (solid, remove dead copper, pour order 239): -63.9,42.5 -63.9,32.1 -60.9,32.1 -60.9,42.5
NetJ6_1 on Bottom Layer "NETJ6_1_L02_P238" (solid, remove dead copper, pour order 238): -52.9,42.5 -52.9,32.1 -49.9,32.1 -49.9,42.5
NetJ6_2 on Bottom Layer "NETJ6_2_L02_P237" (solid, remove dead copper, pour order 237): -48.7,42.5 -48.7,32.1 -45.7,32.1 -45.7,42.5
MGND on Bottom Layer "MGND_L02_P236" (solid, remove dead copper, pour order 236): -59.7,42.5 -59.7,32.1 -53.6,32.1 -53.6,42.5
MGND on Bottom Layer "MGND_L02_P235" (solid, remove dead copper, pour order 235): -44.5,42.5 -44.5,32.1 -40.2,32.1 -40.2,42.5
MCUGND on Bottom Layer "MCUGND_L02_P233" (solid, remove dead copper, pour order 233): -80.9,42.5 -80.9,37.4 -86.1,37.4 -86.1,21.3 -84.5,21.3 -84.5,14 -82.8,14 -82.8,1.4 -88.3,1.4 -88.3,42.5
5vMCU on Bottom Layer "5VMCU_L02_P232" (solid, remove dead copper, pour order 232): -81.2,12.2 -81.2,1.4 -76.4,1.4 -76.4,12.2
NetC30_2 on Bottom Layer "NETC30_2_L02_P231" (solid, remove dead copper, pour order 231): -74,13.7 -74,5.5 -69.2,5.5 -69.2,13.7
24vMCU on Bottom Layer "24VMCU_L02_P230" (solid, remove dead copper, pour order 230): -86.1,26.7 -78.9,26.7 -78.9,22.4 -79.5,22.4 -79.5,15.3 -76.1,15.3 -76.1,14 -82.9,14 -82.9,21.3 -86.1,21.3
NetD1_2 on Bottom Layer "NETD1_2_L02_P229" (solid, remove dead copper, pour order 229): -74.5,29.2 -74.5,27 -86.1,27 -86.1,32.1 -80.9,32.1 -80.9,29.2
MCUGND on Bottom Layer "MCUGND_L02_P228" (solid, remove dead copper, pour order 228): -86,42.5 -86,37.1 -73.4,37.1 -73.4,27.1 -69.6,27.1 -69.6,42.5
Pin on Bottom Layer "PIN_L02_P227" (solid, remove dead copper, pour order 227): -86.1,33.2 -86.1,37.1 -73.8,37.1 -73.8,32.4 -86.1,32.4

## Keep-outs
Keep-Out Layer:
  the board outline again, w0.254

## Other copper
Top Layer:
  pour cut-out: -33.7,-26.65 -29.7,-22.65 -18.3,-22.65 -18.3,-42.1 -33.7,-42.1
  pour cut-out: -65.2,-7.7 -65.2,-9 -53.2,-9 -53.2,-7.7
  pour cut-out: -67.4,-21.9 -66.1,-21.9 -66.1,-9.9 -67.4,-9.9
  pour cut-out: -53.2,-24.1 -53.2,-22.8 -65.2,-22.8 -65.2,-24.1
  pour cut-out: -51,-9.9 -52.3,-9.9 -52.3,-21.9 -51,-21.9
Bottom Layer:
  pour cut-out: -33.2,-32.4 -23.45,-22.65 -18.3,-22.65 -18.3,-42.2 -33.2,-42.2
  pour cut-out: 60.7,30.1 56.3,30.1 56.3,27.7 60.7,27.7
  pour cut-out: 67.714,30.1 63.314,30.1 63.314,27.7 67.714,27.7
  pour cut-out: 74.729,30.1 70.329,30.1 70.329,27.7 74.729,27.7
  pour cut-out: 81.743,30.1 77.343,30.1 77.343,27.7 81.743,27.7
  pour cut-out: 77.343,-30.1 81.743,-30.1 81.743,-27.7 77.343,-27.7
  pour cut-out: 70.329,-30.1 74.729,-30.1 74.729,-27.7 70.329,-27.7
  pour cut-out: 63.314,-30.1 67.714,-30.1 67.714,-27.7 63.314,-27.7
  pour cut-out: 56.3,-30.1 60.7,-30.1 60.7,-27.7 56.3,-27.7
  pour cut-out: -53.2,-24.1 -53.2,-22.8 -65.2,-22.8 -65.2,-24.1
  pour cut-out: -51,-9.9 -52.3,-9.9 -52.3,-21.9 -51,-21.9
  pour cut-out: -67.4,-21.9 -66.1,-21.9 -66.1,-9.9 -67.4,-9.9
  pour cut-out: -65.2,-7.7 -65.2,-9 -53.2,-9 -53.2,-7.7
  pour cut-out: -77.925,10.7 -77.925,7.3 -72.475,7.3 -72.475,10.7

## Silkscreen, mask and mechanical layers (free items; w line width, h text height)
Top Overlay:
  drawing of 151 lines, arcs and shapes, not listed
  text "-15" at -6.4,39.2 h1.2
  text "+15" at -0.8,39.2 h1.2
  text "GND" at -6.6,34 h1.2
  text "B-cur" at -2.3,34 h1.2
  text "+   -" at -90.654,33.354 h1.52 r90
  text "24v" at 15,29.2 h1.2
  text "GND" at 20.2,29.2 h1.2
  text "Analog" at 13.58,26.713 h1
  text "Analog" at 20.18,26.613 h1
  text "5v" at -30.7,25.9 h1.2
  text "GND" at -17.6,25.9 h1.2
  text "5v" at 48.2,24 h1.2
  text "joy-y" at -17.8,21.5 h1.2
  text "fuel" at 47.3,21.4 h1.2
  text "joy-x" at -34.4,21.2 h1.2
  text "24v-2" at 12.28,21.08 h1
  text "24v-1" at 18.48,20.98 h1
  text "24v" at 73.4,21 h1.2
  text "GND" at 7.3,20.9 h1.2
  text "GND" at 7.4,17.9 h1.2
  text "Gas2" at 12.3,17.7 h1.2
  text "Gas1" at 18.8,17.7 h1.2
  text "pressure" at 73.4,16.5 h1.2
  text "A" at 34.981,10.988 h1.2
  text "A" at 23.803,10.95 h1.2
  text "B" at 38.737,10.929 h1.2
  text "B" at 29,10.9 h1.2
  text "start" at -14.3,10.7 h0.9
  text "Out" at 49,10.4 h1.2
  text "Dir-N" at 2.847,10.3 h1
  text "Dir-D" at 13.1,10.2 h1
  text "on" at -17.5,10.1 h1.2
  text "IN" at 45.437,10.029 h1.2
  text "Dir-R" at -7.7,10 h1
  text "speed" at 23.703,9.05 h1.2
  text "rpm" at 33.903,8.95 h1.2
  text "GND" at 2.7,5.3 h1.2
  text "GND" at -18.1,5.2 h1.2
  text "24v" at 7,5.2 h1.2
  text "GND" at 13.2,5.2 h1.2
  text "24v" at 38.1,5.2 h1.2
  text "GND" at 44.409,5.166 h1.2
  text "GND" at 48.609,5.166 h1.2
  text "GND" at 33.903,5.15 h1.2
  text "24v" at -13.8,5.1 h1.2
  text "GND" at -7.8,5.1 h1.2
  text "24v" at -3.7,5.1 h1.2
  text "24v" at 17.5,5.1 h1.2
  text "24v" at 27.8,5.1 h1.2
  text "GND" at 23.303,5.05 h1.2
  text "BOOT" at -84.946,-3.546 h1.52
  text "Mode" at -84.846,-11.646 h1.52
  text "GND" at -81.15,-17.4 h0.8
  text "MOSI" at -81.15,-19.9 h0.8
  text "MISO" at -81.15,-22.4 h0.8
  text "SCK" at -81.15,-24.9 h0.8
  text "GND" at -81.15,-31.9 h0.8
  text "CLK" at -81.15,-34.4 h0.8
  text "3v3" at -50.6,-34.85 h0.8 r90
  text "GND" at -57.95,-35 h0.8 r90
  text "RX" at -55.5,-35 h0.8 r90
  text "TX" at -53.05,-35 h0.8 r90
  text "A" at -39.1,-35.8 h1.2
  text "B" at -36.2,-35.8 h1.2
  text "GND" at -43.891,-35.834 h1.2
  text "IO" at -81.15,-36.9 h0.8
  text "3v3" at -81.15,-39.4 h0.8
  text "A" at -39.2,-39.8 h1.2
  text "B" at -36.368,-39.82 h1.2
  text "GND" at -43.891,-39.834 h1.2
Mechanical 15:
  lines w0.254: 45,1.3 61,1.3

## Text inside footprints (layer, text, board x,y; h text height)
J4: Mechanical 13 "PCB EDGE" at -65.19,-42.88 h0.8 r180
RAMON1: Top Overlay "www.ramonic.com" at -59.75,1.35 h2
RAMON2: Bottom Overlay "www.ramonic.com" at -43.65,20.35 h2